# Altium PCB PCB_Down.PcbDoc (part 1 of 2)
Units mm, origin at the board's own origin, x right, y up, seen from the top; angles counter-clockwise.
Board outline 152.02 x 107.03 mm, 2 copper layers (Top Layer, Bottom Layer); 218 components, 149 nets, 1560 pads, 136 vias.
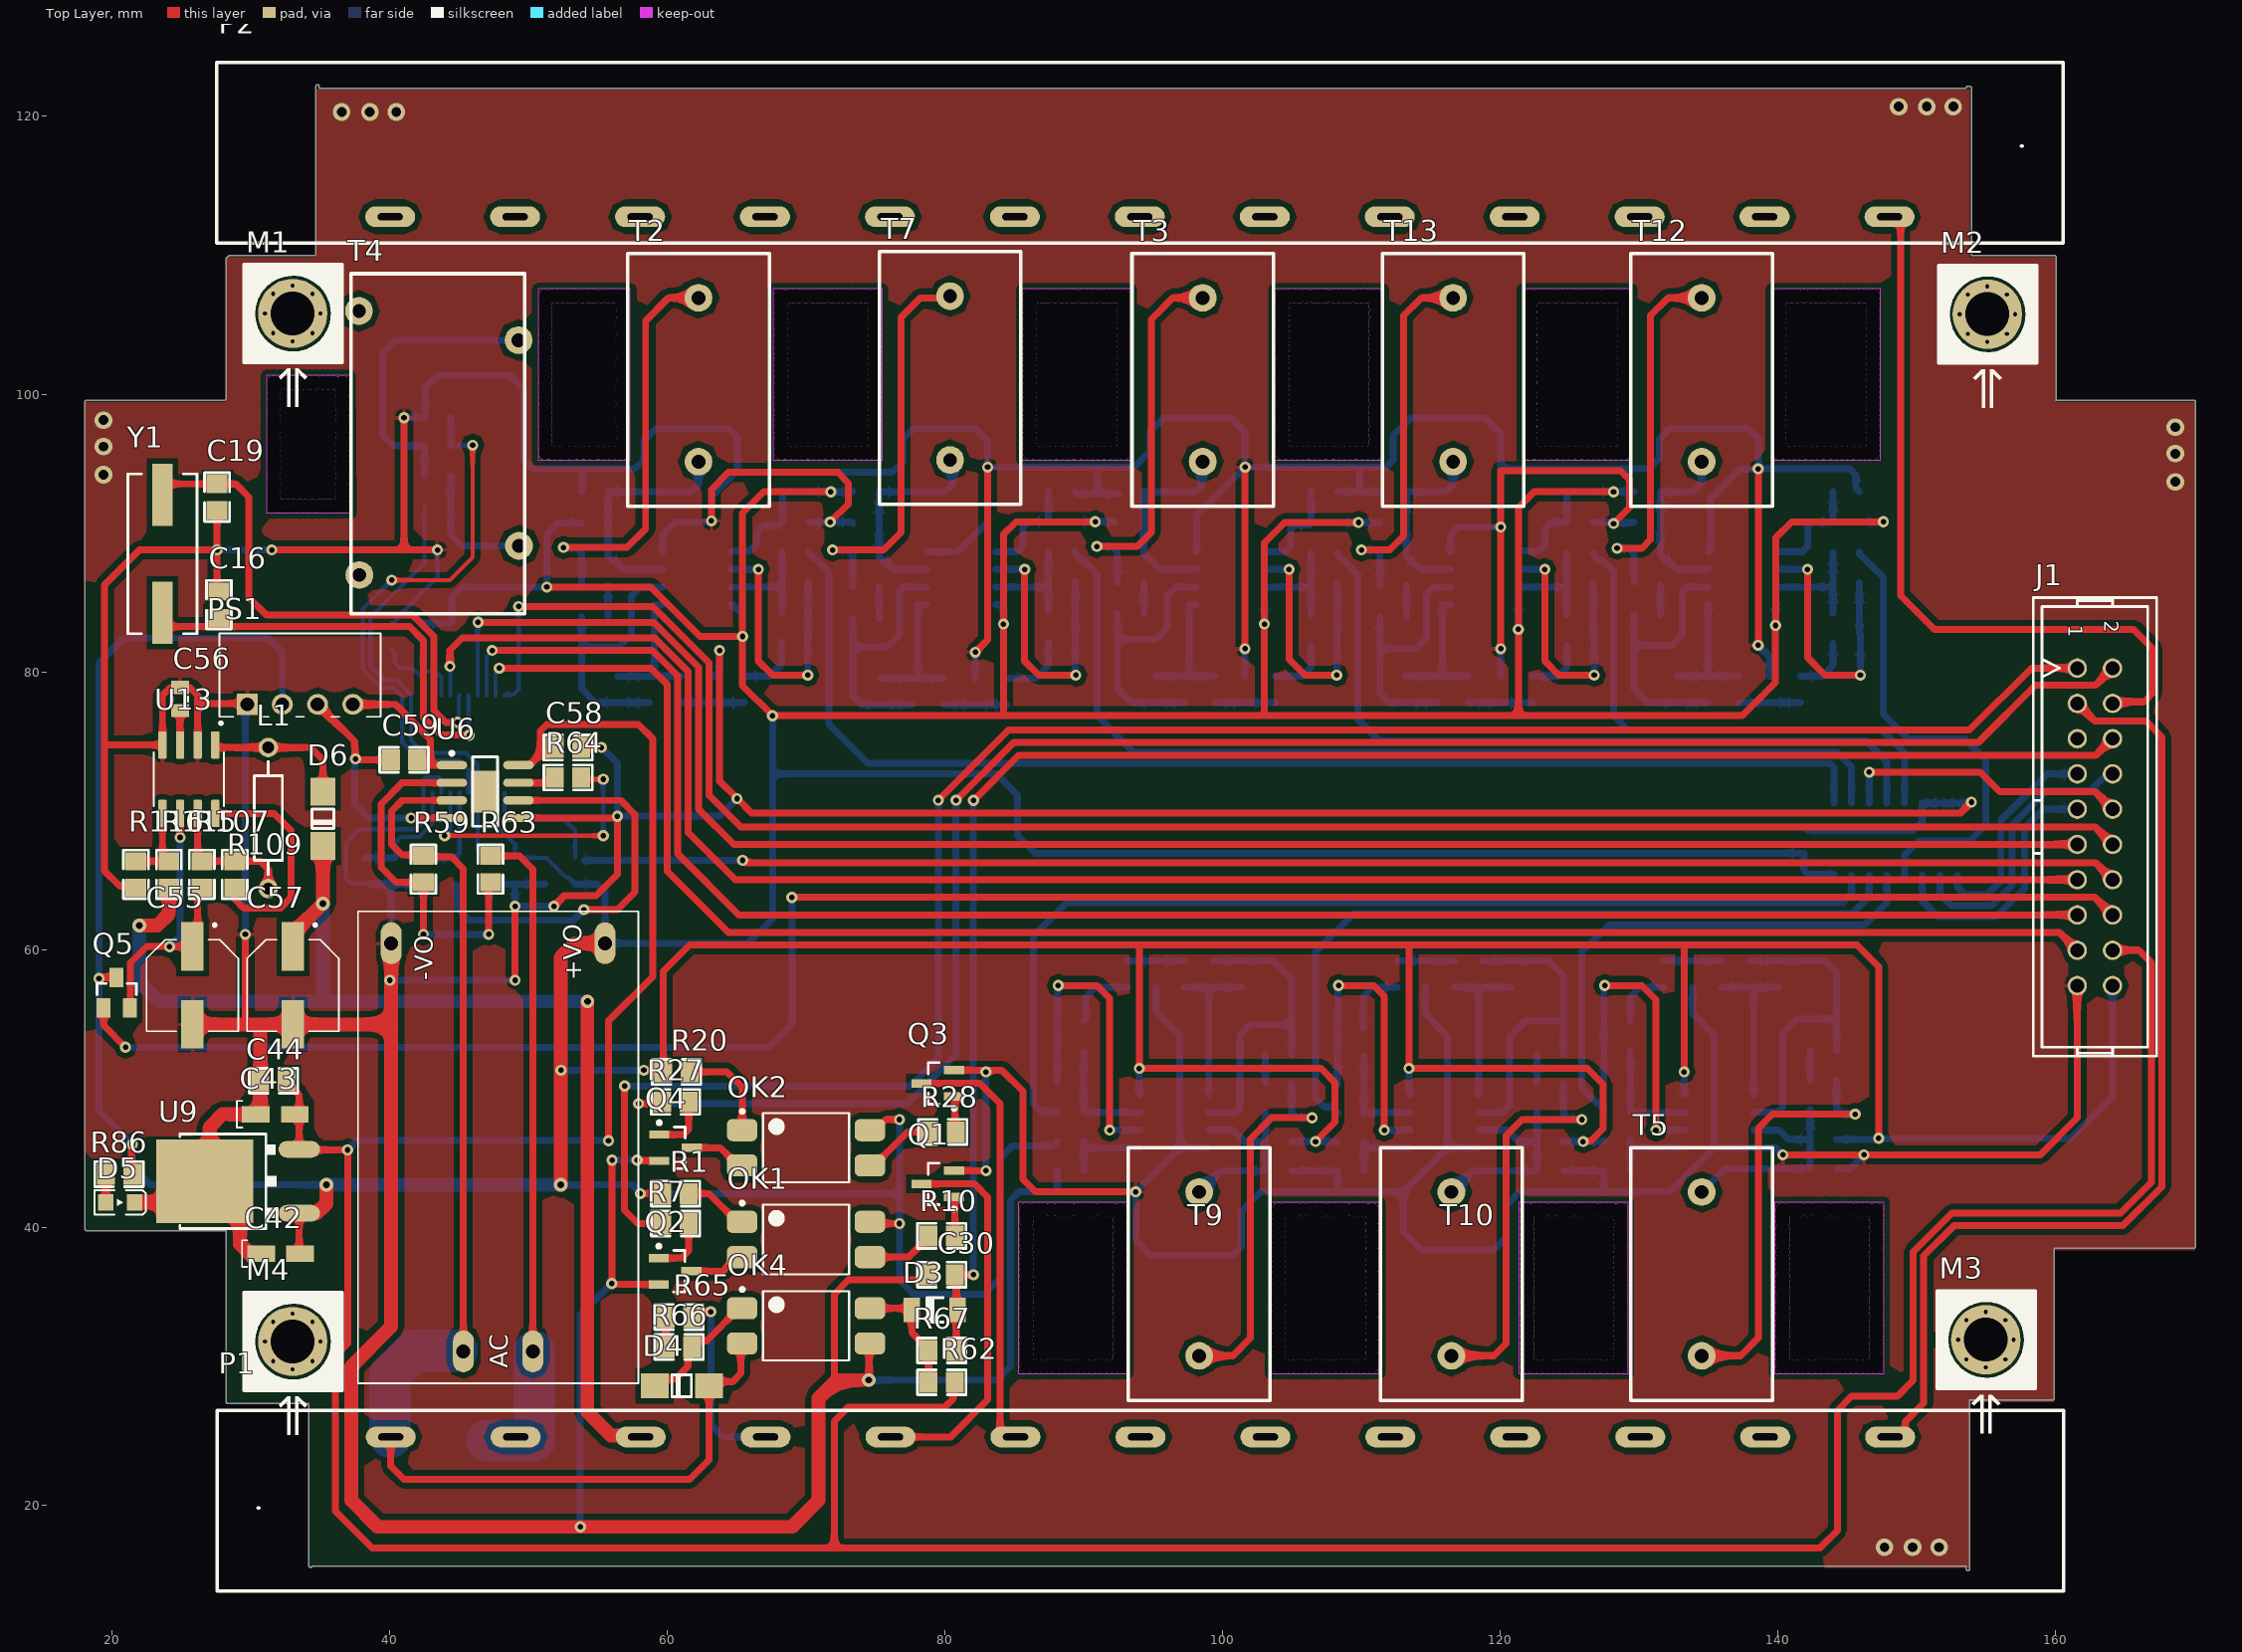
[diagram p0: Top Layer view]
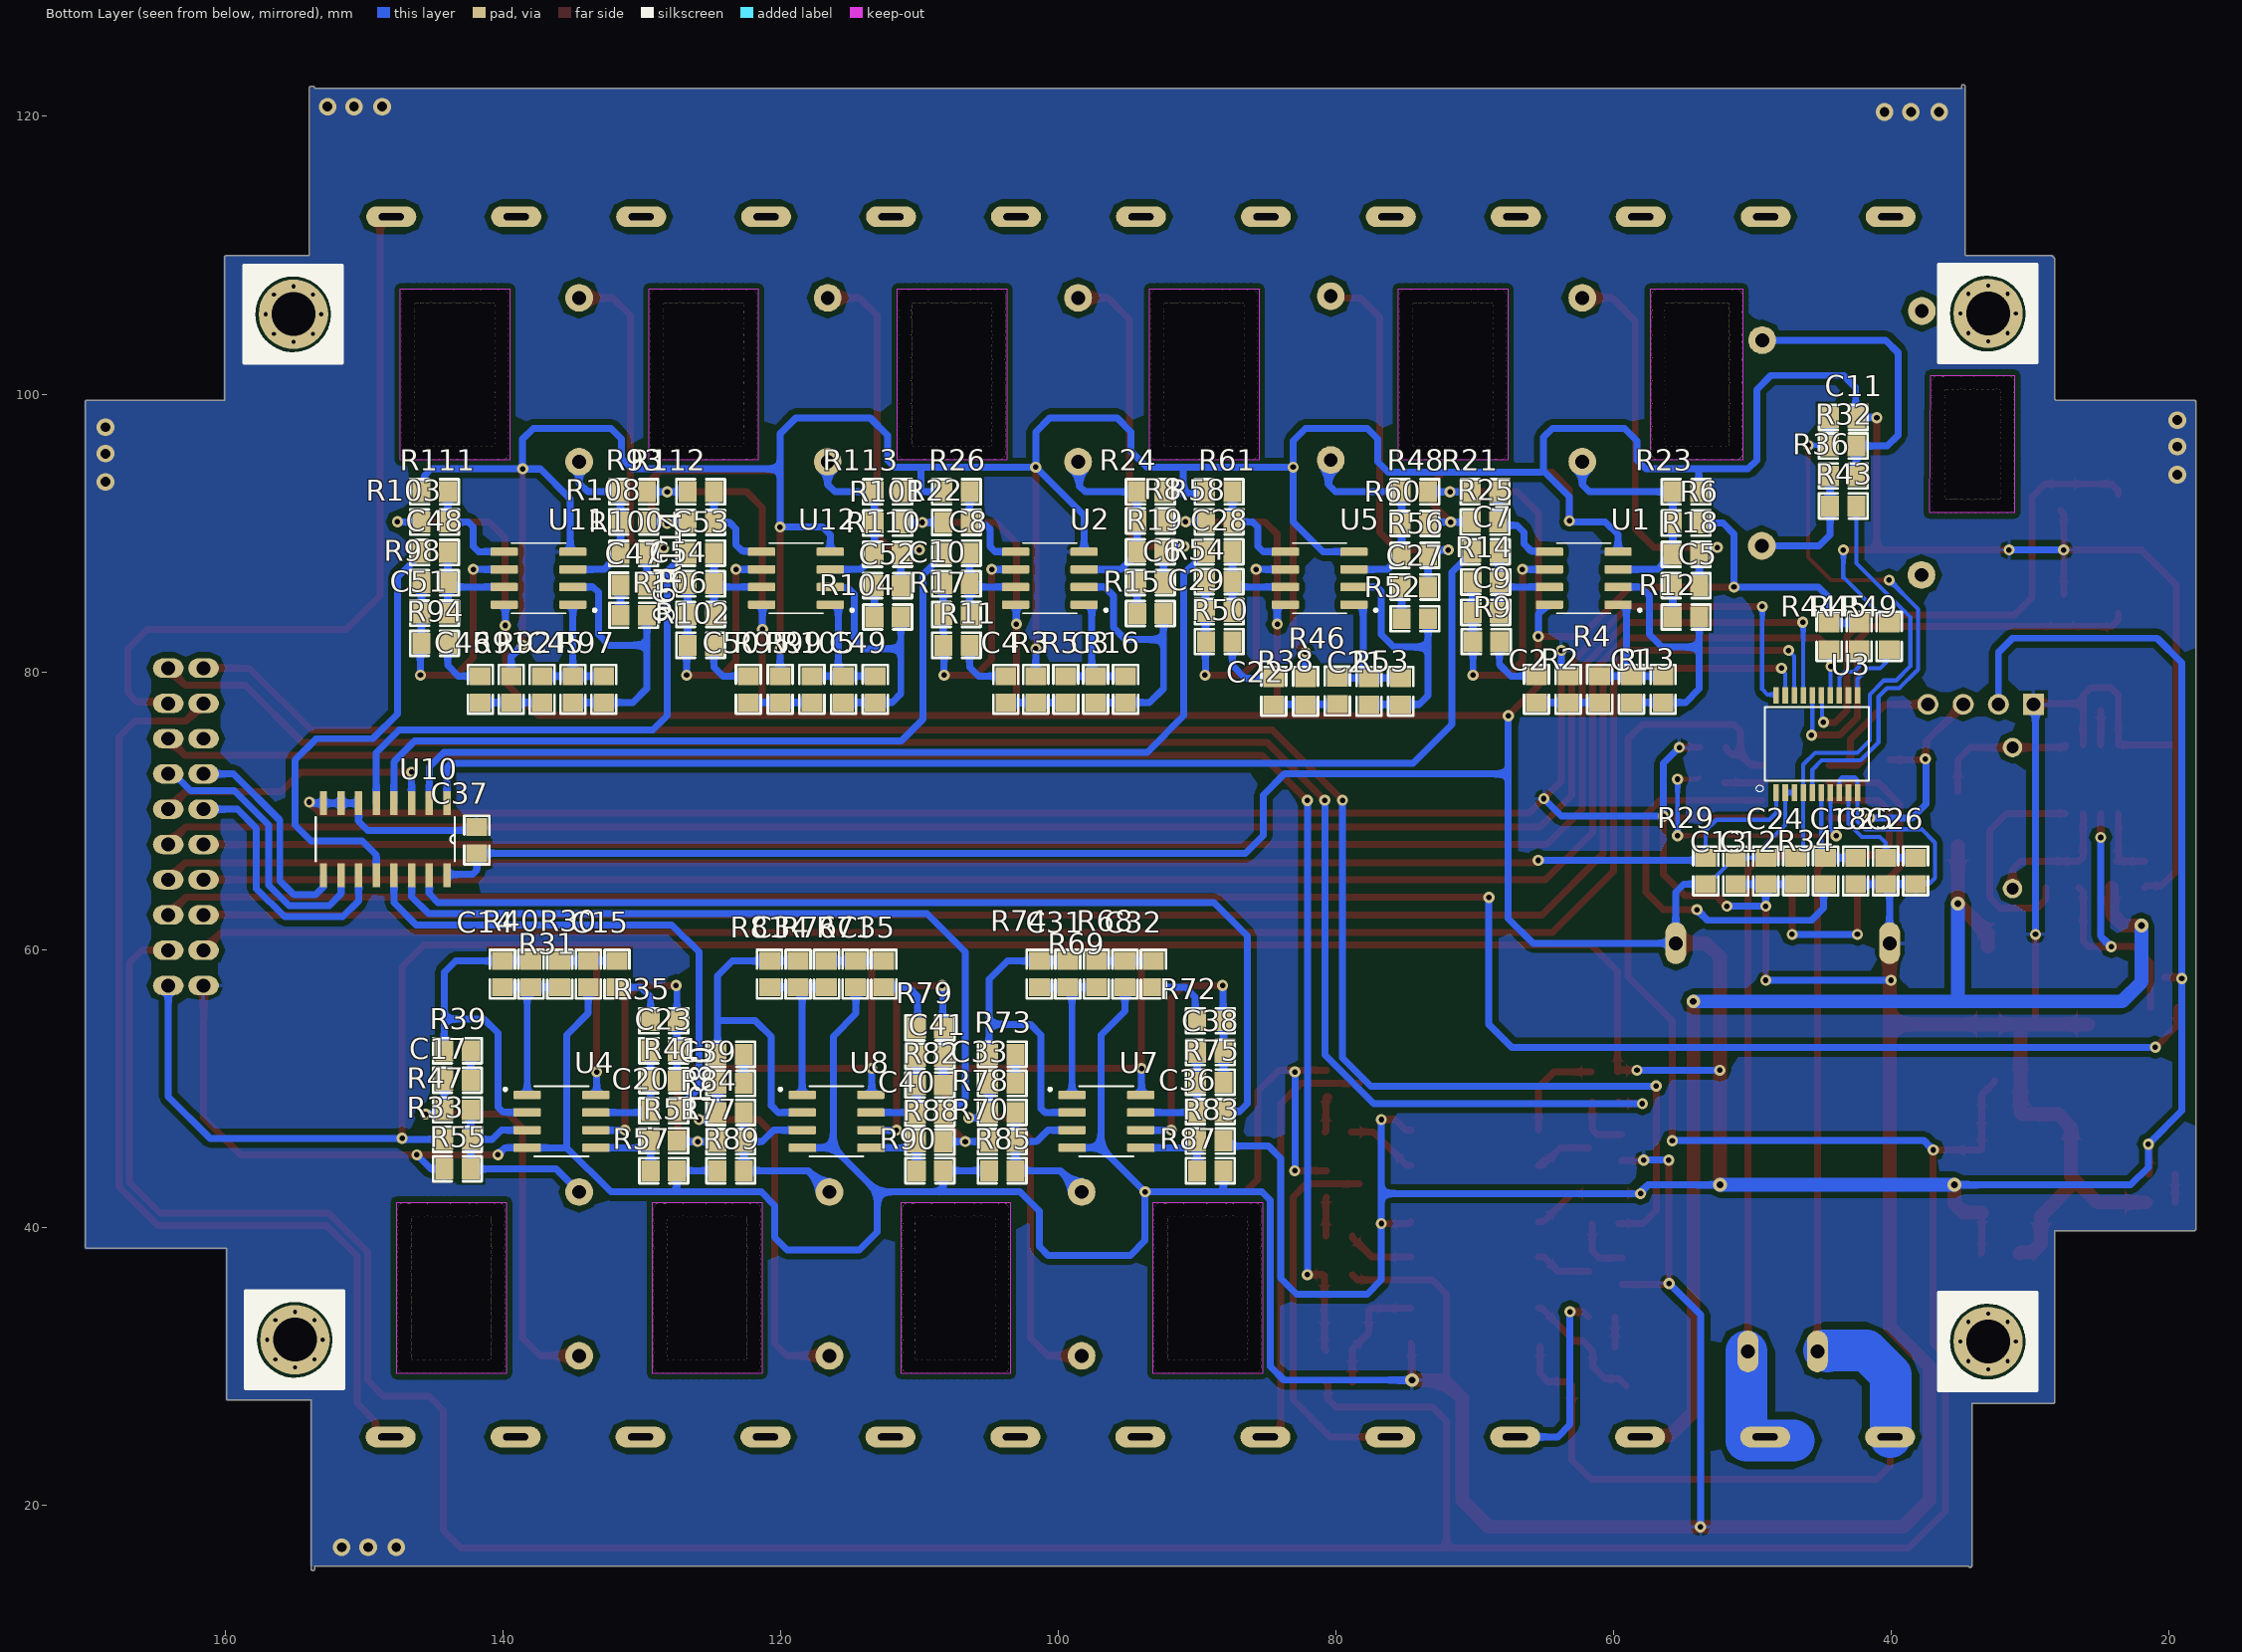
[diagram p1: Bottom Layer view, seen from below]

## Layer stack, top to bottom
Top Solder: solder mask 0.0102, Solder Resist, Dk 3.5
Top Layer: signal copper 0.0356
Dielectric 1: dielectric 0.32, FR-4, Dk 4.8
Bottom Layer: signal copper 0.0356
Bottom Solder: solder mask 0.0102, Solder Resist, Dk 3.5

## Board outline
18.161,39.751 28.194,39.751 28.194,27.432 ccw(c28.321,27.432) 28.321,27.305 34.163,27.305 34.163,15.621 ccw(c34.29,15.621) 34.412,15.585 153.543,15.585 153.543,15.391 ccw(c153.67,15.391) 153.797,15.391 153.797,27.559 159.766,27.559 ccw(c159.766,27.686) 159.893,27.686 159.893,38.481 169.926,38.481 ccw(c169.926,38.608) 170.053,38.608 170.053,99.441 ccw(c169.926,99.441) 169.926,99.568 160.02,99.568 160.02,109.855 ccw(c159.893,109.855) 159.893,109.982 153.924,109.982 153.924,122.047 ccw(c153.797,122.047) 153.797,122.174 153.67,122.174 ccw(c153.67,122.047) 153.544,122.03 34.925,122.03 34.925,122.164 ccw(c34.798,122.164) 34.671,122.164 34.671,110.057 34.596,109.982 28.47,109.982 ccw(c28.47,109.855) 28.379,109.945 28.38,109.945 28.231,109.796 28.231,109.797 ccw(c28.321,109.706) 28.194,109.706 28.194,99.643 28.119,99.568 18.31,99.568 ccw(c18.31,99.441) 18.235,99.544 ccw(c18.161,99.441) 18.034,99.441 18.034,39.878 ccw(c18.161,39.878)
cut-out: 93.139,41.782 85.265,41.782 85.265,29.463 93.139,29.463
cut-out: 111.3,41.782 103.426,41.782 103.426,29.463 111.3,29.463
cut-out: 129.207,41.782 121.333,41.782 121.333,29.463 129.207,29.463
cut-out: 147.622,41.782 139.748,41.782 139.748,29.463 147.622,29.463
cut-out: 37.132,101.345 31.115,101.345 31.115,91.44 37.211,91.44
cut-out: 57.325,107.568 50.673,107.568 50.673,95.249 57.325,95.249
cut-out: 75.486,107.568 67.612,107.568 67.612,95.249 75.486,95.249
cut-out: 93.393,107.568 85.519,107.568 85.519,95.249 93.393,95.249
cut-out: 111.554,107.568 103.68,107.568 103.68,95.249 111.554,95.249
cut-out: 129.461,107.568 121.587,107.568 121.587,95.249 129.461,95.249
cut-out: 147.368,107.568 139.494,107.568 139.494,95.249 147.368,95.249

## Design rules (kind name [scope] priority, off if disabled: settings)
Clearance [All] p1: gap=0.254 ignorepadtopadclearanceinfootprint=FALSE except(0: Arc-Hole Track-Hole SMDPad-Hole THPad-Hole Via-Hole Fill-Hole Poly-Hole Region-Hole Text-Hole; 0.4: Arc-Fill Arc-Poly Arc-Region Track-Fill Track-Poly Track-Region SMDPad-Fill SMDPad-Poly SMDPad-Region THPad-Fill THPad-Poly THPad-Region Via-Fill Via-Poly Via-Region Fill-Fill Fill-Poly Fill-Region Poly-Poly Poly-Region Region-Region)
PolygonConnect [All] p1: connectstyle=Relief reliefconductorwidth=0.254 reliefentries=4 polygonreliefangle="90 Angle" airgapwidth=0.254
RoutingVias [All] p1: holewidth=0.4 width=0.8 viastyle="Through Hole" minholewidth=0.4 minwidth=0.8 maxholewidth=0.4 maxwidth=0.8
SolderMaskExpansion [All] p1: expansion=0.102 istentingtop=FALSE
Width [All] p1: maxlimit=3 minlimit=0.3 preferedwidth=0.5 minimp=50.000000 maximp=50.000000 favimp=50.000000
30 further rules are at their usual default settings.

## Components (designator, comment, footprint, x,y, rotation, side; value= is the part's Value field where it differs from the comment)
C1 "0nF" 0805 58.692,78.74 r270 bottom value=100nF
C2 "0nF" 0805 65.532,78.74 r270 bottom value=100nF
C3 "0nF" 0805 97.282,78.74 r270 bottom value=100nF
C4 "0nF" 0805 103.759,78.74 r270 bottom value=100nF
C5 "0nF" 0805 54.762,86.201 r180 bottom value=100nF
C6 "0nF" 0805 93.346,86.423 r180 bottom value=100nF
C7 "0nF" 0805 69.215,88.646 r180 bottom value=100nF
C8 "0nF" 0805 107.315,88.544 r180 bottom value=100nF
C9 "0nF" 0805 69.191,84.277 r0 bottom value=100nF
C10 "0nF" 0805 107.315,86.335 r0 bottom value=100nF
C11 "33nF" 0805 43.433,98.323 r180 bottom
C12 "10uF" 0805 49.022,65.659 r270 bottom
C13 "100nF" 0805 51.181,65.659 r270 bottom
C14 "0nF" 0805 140.017,58.227 r90 bottom value=100nF
C15 "0nF" 0805 131.762,58.227 r90 bottom value=100nF
C16 "22pF" 0805 27.686,84.836 r90 top
C17 "0nF" 0805 143.256,50.578 r0 bottom value=100nF
C18 "33nF" 0805 42.545,65.659 r90 bottom
C19 "22pF" 0805 27.559,92.583 r270 top
C20 "0nF" 0805 128.396,48.387 r0 bottom value=100nF
C21 "0nF" 0805 77.597,78.592 r270 bottom value=100nF
C22 "0nF" 0805 84.455,78.592 r270 bottom value=100nF
C23 "0nF" 0805 128.396,52.705 r180 bottom value=100nF
C24 "33nF" 0805 46.863,65.659 r90 bottom
C25 "100nF" 0805 40.386,65.659 r90 bottom
C26 "10uF" 0805 38.227,65.659 r90 bottom
C27 "0nF" 0805 74.294,86.106 r180 bottom value=100nF
C28 "0nF" 0805 88.391,88.646 r180 bottom value=100nF
C29 "0nF" 0805 88.391,84.328 r0 bottom value=100nF
C30 "100nF" 0805 79.756,36.576 r0 top
C31 "0nF" 0805 99.289,58.227 r90 bottom value=100nF
C32 "0nF" 0805 93.116,58.227 r90 bottom value=100nF
C33 "0nF" 0805 104.012,50.355 r0 bottom value=100nF
C34 "0nF" 0805 118.72,58.227 r90 bottom value=100nF
C35 "0nF" 0805 112.547,58.227 r90 bottom value=100nF
C36 "0nF" 0805 89.028,48.323 r0 bottom value=100nF
C37 "100nF" 0805 141.859,67.879 r90 bottom
C38 "0nF" 0805 89.028,52.578 r180 bottom value=100nF
C39 "0nF" 0805 123.571,50.355 r0 bottom value=100nF
C40 "0nF" 0805 109.219,48.184 r0 bottom value=100nF
C41 "0nF" 0805 109.219,52.299 r180 bottom value=100nF
C42 "10uF" "Cap1206_(3216X18L)Size A" 30.734,38.1 r0 top
C43 "10uF" "Cap1206_(3216X18L)Size A" 30.353,48.133 r0 top
C44 "100nF" 0805 31.623,50.546 r180 top
C45 "0nF" 0805 134.938,78.74 r270 bottom value=100nF
C46 "0nF" 0805 141.605,78.74 r270 bottom value=100nF
C47 "0nF" 0805 130.556,86.233 r180 bottom value=100nF
C48 "0nF" 0805 144.907,88.595 r180 bottom value=100nF
C49 "0nF" 0805 113.157,78.74 r270 bottom value=100nF
C50 "0nF" 0805 122.301,78.74 r270 bottom value=100nF
C51 "0nF" 0805 144.907,84.226 r0 bottom value=100nF
C52 "0nF" 0805 112.268,86.201 r180 bottom value=100nF
C53 "0nF" 0805 125.73,88.544 r180 bottom value=100nF
C54 "0nF" 0805 125.73,86.335 r0 bottom value=100nF
C55 "Cap2" "cap 100uF" 22.452,61.303 r270 top value=100uF
C56 "Cap" CAP805 24.892,78.866 r270 top value=1.5nF
C57 "Cap2" "cap 100uF" 29.691,61.303 r270 top value=100uF
C58 "100nF" 0805 52.832,74.549 r180 top
C59 "100nF" 0805 41.021,73.66 r0 top
D3 "4148" "Diode 1n4148 SMD" 80.899,34.036 r180 top
D4 "Diode 1N4007" "Diode 1N4007 SMD" 62.992,28.575 r180 top
D5 "LED SMD PACKAGE" LED_SMD_0805 20.574,41.783 r180 top
D6 "SS34" "Diode 1N4007 SMD" 35.179,71.374 r270 top
J1 "IDC_2X10" IDC_2X10 162.814,68.834 r270 top
L1 "Inductor" AXIAL-0.4 31.242,69.469 r90 top value=180uH
M1 "Screw" "Board Screw" 33.003,105.808 r0 top
M2 "Screw" "Board Screw" 155.067,105.759 r0 top
M3 "Screw" "Board Screw" 154.957,31.894 r0 top
M4 "Screw" "Board Screw" 33.003,31.767 r0 top
OK1 "PC817" "SMT Gullwing Lead-Form" 69.977,39.116 r0 top
OK2 "PC817" "SMT Gullwing Lead-Form" 69.977,45.72 r0 top
OK4 "PC817" "SMT Gullwing Lead-Form" 69.977,32.893 r0 top
P1 "Header 13" "terminal 13p" 171.565,29.892 r180 top locked
P2 "Header 13" "terminal 13p" 16.522,107.776 r0 top locked
PS1 "B0505S-1WR2" CONV_B0505S-1WR2 33.528,79.756 r0 top
Q1 "C945" SOT23_BEC_M 79.47,43.114 r180 top
Q2 "C945" SOT23_BEC_M 60.547,36.83 r0 top
Q3 "C945" SOT23_BEC_M 79.47,50.353 r180 top
Q4 "C945" SOT23_BEC_M 60.579,45.72 r0 top
Q5 "AO3401A" AO3401A 20.32,56.896 r0 top
R1 "Res1" 0805 60.579,42.418 r0 top value=1K
R2 "?K" 0805 63.252,78.74 r270 bottom
R3 "?K" 0805 101.6,78.74 r270 bottom
R4 "?K" 0805 60.972,78.74 r90 bottom
R5 "?K" 0805 99.441,78.74 r90 bottom
R6 "1K" 0805 54.762,90.71 r180 bottom
R7 "Res1" 0805 60.579,40.259 r180 top value=1K
R8 "1K" 0805 93.346,90.868 r180 bottom
R9 "10K" 0805 69.154,82.169 r180 bottom
R10 "Res1" 0805 79.756,39.37 r180 top value=1K
R11 "10K" 0805 107.315,81.915 r180 bottom
R12 "1K" 0805 54.762,83.947 r0 bottom
R13 "100K" 0805 56.412,78.74 r270 bottom
R14 "100K" 0805 69.191,86.462 r0 bottom
R15 "1K" 0805 93.346,84.201 r0 bottom
R16 "100K" 0805 95.123,78.74 r270 bottom
R17 "100K" 0805 107.315,84.125 r0 bottom
R18 "100R" 0805 54.762,88.456 r180 bottom
R19 "100R" 0805 93.346,88.646 r180 bottom
R20 "Res1" 0805 60.645,51.181 r0 top value=1K
R21 "10K" 0805 69.238,92.964 r0 bottom
R22 "10K" 0805 107.315,90.754 r0 bottom
R23 "1K" 0805 54.762,92.964 r0 bottom
R24 "1K" 0805 93.346,92.964 r0 bottom
R25 "10K" 0805 69.239,90.78 r180 bottom
R26 "10K" 0805 107.315,92.964 r180 bottom
R27 "Res1" 0805 60.579,49.022 r180 top value=1K
R28 "Res1" 0805 79.822,46.863 r180 top value=1K
R29 "1K" 0805 53.34,65.659 r90 bottom
R30 "?K" 0805 133.826,58.227 r90 bottom
R31 "?K" 0805 135.89,58.227 r270 bottom
R32 "1K" 0805 43.433,96.266 r180 bottom
R33 "1K" 0805 143.256,46.323 r0 bottom
R34 "1K" 0805 44.704,65.659 r270 bottom
R35 "10K" 0805 128.396,54.864 r0 bottom
R36 "26" 0805 43.433,94.107 r0 bottom
R38 "?K" 0805 82.169,78.592 r270 bottom
R39 "1K" 0805 143.256,52.705 r180 bottom
R40 "100K" 0805 137.954,58.227 r90 bottom
R41 "100K" 0805 128.396,50.546 r180 bottom
R43 "1K" 0805 43.433,91.948 r180 bottom
R44 "1K" 0805 44.45,82.55 r270 bottom
R45 "1K" 0805 42.291,82.55 r270 bottom
R46 "?K" 0805 79.883,78.613 r90 bottom
R47 "100R" 0805 143.256,48.45 r0 bottom
R48 "1K" 0805 74.294,92.964 r180 bottom
R49 "1K" 0805 40.132,82.55 r270 bottom
R50 "10K" 0805 88.391,82.169 r180 bottom
R51 "10K" 0805 128.396,46.228 r180 bottom
R52 "1K" 0805 74.294,83.82 r0 bottom
R53 "100K" 0805 75.311,78.592 r270 bottom
R54 "100K" 0805 88.391,86.487 r0 bottom
R55 "1K" 0805 143.256,44.196 r180 bottom
R56 "100R" 0805 74.294,88.392 r180 bottom
R57 "10K" 0805 128.396,44.069 r0 bottom
R58 "10K" 0805 88.391,90.805 r0 bottom
R59 "1K" 0805 42.418,65.786 r90 top
R60 "1K" 0805 74.294,90.678 r0 bottom
R61 "10K" 0805 88.391,92.964 r180 bottom
R62 "Resistor" 0805 79.75,28.829 r0 top value=1M
R63 "1K" 0805 47.244,65.786 r270 top
R64 "5K6" 0805 52.832,72.39 r180 top
R65 "Resistor" 0805 60.833,33.528 r0 top value=100k
R66 "Resistor" 0805 60.833,31.369 r180 top value=100k
R67 "Resistor" 0805 79.751,31.115 r180 top value=1M
R68 "?K" 0805 95.174,58.227 r90 bottom
R69 "?K" 0805 97.231,58.227 r270 bottom
R70 "1K" 0805 104.012,46.164 r0 bottom
R71 "?K" 0805 114.605,58.227 r90 bottom
R72 "10K" 0805 89.028,54.864 r0 bottom
R73 "1K" 0805 104.012,52.451 r180 bottom
R74 "100K" 0805 101.346,58.227 r90 bottom
R75 "100K" 0805 89.028,50.451 r180 bottom
R76 "?K" 0805 116.662,58.227 r270 bottom
R77 "1K" 0805 123.571,46.164 r0 bottom
R78 "100R" 0805 104.012,48.26 r0 bottom
R79 "10K" 0805 109.219,54.356 r0 bottom
R80 "1K" 0805 123.571,52.451 r180 bottom
R81 "100K" 0805 120.777,58.227 r90 bottom
R82 "100K" 0805 109.219,50.241 r180 bottom
R83 "10K" 0805 89.028,46.196 r180 bottom
R84 "100R" 0805 123.571,48.26 r0 bottom
R85 "1K" 0805 104.012,44.069 r180 bottom
R86 "1K" 0805 20.495,43.815 r180 top
R87 "10K" 0805 89.028,44.069 r0 bottom
R88 "10K" 0805 109.219,46.126 r180 bottom
R89 "1K" 0805 123.571,44.069 r180 bottom
R90 "10K" 0805 109.219,44.069 r0 bottom
R91 "?K" 0805 139.382,78.74 r270 bottom
R92 "?K" 0805 137.16,78.74 r90 bottom
R93 "1K" 0805 130.556,92.964 r180 bottom
R94 "10K" 0805 144.907,82.042 r180 bottom
R95 "?K" 0805 120.015,78.74 r270 bottom
R96 "1K" 0805 130.556,84.074 r0 bottom
R97 "100K" 0805 132.715,78.74 r270 bottom
R98 "100K" 0805 144.907,86.411 r0 bottom
R99 "?K" 0805 117.729,78.74 r90 bottom
R100 "100R" 0805 130.556,88.519 r180 bottom
R101 "1K" 0805 112.268,90.71 r180 bottom
R102 "10K" 0805 125.73,81.915 r180 bottom
R103 "10K" 0805 144.907,90.78 r0 bottom
R104 "1K" 0805 112.268,83.947 r0 bottom
R105 "100K" 0805 115.443,78.74 r270 bottom
R106 "100K" 0805 125.73,84.125 r0 bottom
R107 "Res1" 0805 26.458,65.405 r90 top value=0.5R
R108 "1K" 0805 130.556,90.805 r0 bottom
R109 "Res1" 0805 28.829,65.405 r270 top value=180R
R110 "100R" 0805 112.268,88.455 r180 bottom
R111 "10K" 0805 144.907,92.964 r180 bottom
R112 "10K" 0805 125.73,92.964 r0 bottom
R113 "1K" 0805 112.268,92.964 r0 bottom
R114 "10K" 0805 125.73,90.754 r180 bottom
R115 "Res1" 0805 24.088,65.405 r90 top value=18K
R116 "Res1" 0805 21.717,65.405 r90 top value=1K
T2 "CST-1020" zmct103c 57.03,110.334 r270 top
T3 "CST-1020" zmct103c 93.352,110.334 r270 top
T4 "CST-1020" CT1005A 38.606,110.674 r270 top
T5 "CST-1020" zmct103c 139.693,27.334 r90 top
T7 "CST-1020" zmct103c 75.153,110.455 r270 top
T9 "CST-1020" zmct103c 103.498,27.334 r90 top
T10 "CST-1020" zmct103c 121.659,27.334 r90 top
T12 "CST-1020" zmct103c 129.293,110.334 r270 top
T13 "CST-1020" zmct103c 111.386,110.334 r270 top
U1 "LM358D" SOIC127P599X175-8N 62.127,86.741 r0 bottom
U2 "LM358D" SOIC127P599X175-8N 100.584,86.741 r0 bottom
U3 "ADE7753" SSOP-20 45.339,74.803 r90 bottom
U4 "LM358D" SOIC127P599X175-8N 135.763,47.625 r180 bottom
U5 "LM358D" SOIC127P599X175-8N 81.153,86.741 r0 bottom
U6 "AMC1100DWV" "SOIC 8 - THPAD" 46.863,71.374 r0 top
U7 "LM358D" SOIC127P599X175-8N 96.52,47.625 r180 bottom
U8 "LM358D" SOIC127P599X175-8N 115.951,47.625 r180 bottom
U9 "LF33" DPAK_3 33.47,43.307 r90 top
U10 "74HC4051D" SOIC127P600X175-16N 148.463,67.945 r270 bottom
U11 "LM358D" SOIC127P599X175-8N 137.414,86.741 r0 bottom
U12 "LM358D" SOIC127P599X175-8N 118.872,86.741 r0 bottom
U13 "MC34063AD" SOIC127P599X175-8N 25.527,72.263 r270 top
Y1 "16 MHz" "Crystal SMD" 23.622,88.494 r270 top
? "HLK-PM01" HLK-PM01 47.799,45.752 r90 top

## Footprints (in the part's own frame and the unit in brackets; to place one, negate y for a bottom-side part, rotate by r counter-clockwise, add the part's x,y. Pads: shape width x height; smd on the part's side, far side on the other; paste and mask are expansions set on the pad)
0805 [mm]
  rect 1.3x1.5 smd: 1(-0.95,0) 2(0.95,0)
  silkscreen extent -1.75,-0.9 1.75,0.9, body extent -1.65,-0.89 1.65,0.89, height 1
AO3401A [mm] "Mosfet"
  rect 1x1.4 smd: 1(-0.95,-1.1) 2(0.95,-1.1) 3(0,1.1)
  silkscreen extent -1.42,-0.15 1.42,0.66, body extent -1.5,-1.13 1.5,1.13, height 1.28
AXIAL-0.4 [mm] "Axial Device, Thru-Hole; 2 Leads; 0.4 in Pin Spacing"
  round 1.4 hole 0.85: 1(-5.08,0) 2(5.08,0)
  silkscreen extent -4.06,-1.02 4.06,1.02
"Board Screw" [mm]
  round 0.6 hole 0.3: S(-2,0) S(-1.414,-1.414) S(-1.414,1.414) S(0,-2) S(0,2) S(1.414,-1.414) S(1.414,1.414) S(2,0)
  round 5 hole 3.15 mask+0.1: S(0,0)
  silkscreen extent -3.49,-6.75 3.56,3.52, body extent -2.67,-2.64 2.69,2.72, height 2.34
CAP805 [mm]
  rect 0.95x1.3 smd: 1(0,0) 2(1.65,0)
  silkscreen extent 0.67,-0.55 0.97,0.55, body extent -0.19,-0.63 1.84,0.63, height 0.65
"Cap1206_(3216X18L)Size A" [mm] "Chip Capacitor, 2-Leads, Body 3.2x1.6mm, IPC High Density, chip Tantalum"
  rect 1.999x1.199 smd: 1(0,0) 2(2.8,0)
  silkscreen extent -1.38,-0.97 -0.99,0.97, body extent -0.43,-0.9 3.21,0.9, height 1.8
"cap 100uF" [mm]
  rect 3.5x1.6 smd: 1(1.093,3.329) 2(6.693,3.329)
  silkscreen extent -0.56,0.03 7.19,6.63, body extent 1.07,0.82 6.91,5.98, height 5.22
CONV_B0505S-1WR2 [mm]
  rect 1.508x1.508 hole 1: 1(-3.81,-2.1)
  round 1.508 hole 1: 2(-1.27,-2.1) 3(1.27,-2.1) 4(3.81,-2.1)
  silkscreen extent -6.84,-3 5.8,3
"Crystal SMD" [mm] "DESIGNER ABBAS BASEREH"
  rect 4.5x1.5 smd: 1(-4.25,0) 2(4.25,0)
  silkscreen extent -5.75,-2.5 5.75,2.5, body extent -6.21,-2.25 6.09,2.25, height 5.18
CT1005A [mm]
  round 2 hole 1: 1(6.788,10.67) 2(21.6,10.7) 3(23.7,-0.8) 4(4.688,-0.829)
  silkscreen extent 2,-1.4 26.5,11.1, body extent 2.4,-0.7 26.41,10.4, height 25.2
"Diode 1N4007 SMD" [mm] "DO-214AC 1N4001-4007"
  rect 2x1.8 smd: 1(0,0) 2(3.92,0)
  silkscreen extent 1.27,-0.81 2.67,0.83, body extent -0.54,-1.36 4.46,1.34, height 2.16
"Diode 1n4148 SMD" [mm] "Mini MELF SOD-80"
  rect 1.2x1.75 smd: 1(0,0) 2(3.3,0)
  silkscreen extent 1.04,-0.88 2.22,0.87, body extent -0.13,-0.75 3.37,0.75, height 1.55
DPAK_3 [mm] "D-PAK (TO-252), 3-Pads, Body 6.2x6.7mm"
  oval 1.2x3 smd: 1(-2.3,0) 3(2.3,0)
  rect 6x7 smd: 4(0,6.8)
  silkscreen extent -3.4,1.63 3.4,8.6, body extent -3.37,-0.5 3.37,9.6, height 2.37
HLK-PM01 [mm]
  oval 3.016x1.508 hole 1: P$1(-14.7,2.5) P$2(-14.7,-2.5) P$3(14.7,7.7) P$4(14.7,-7.7)
  silkscreen extent -17,-10.1 17,10.1
IDC_2X10 [mm]
  round 1.4 / inner round 1.4 / far side oval 1.4x2.2 hole 1 mask+0.1: 1(-11.43,-1.27) 2(-11.43,1.27) 3(-8.89,-1.27) 4(-8.89,1.27) 5(-6.35,-1.27) 6(-6.35,1.27) 7(-3.81,-1.27) 8(-3.81,1.27) 9(-1.27,-1.27) 10(-1.27,1.27) 11(1.27,-1.27) 12(1.27,1.27) 13(3.81,-1.27) 14(3.81,1.27) 15(6.35,-1.27) 16(6.35,1.27) 17(8.89,-1.27) 18(8.89,1.27) 19(11.43,-1.27) 20(11.43,1.27)
  silkscreen extent -16.51,-4.45 16.51,4.45, body extent -16.53,-4.42 16.53,4.75, height 9.13
LED_SMD_0805 [mm] "SMD Mono-color Chip LED, body 2.0x1.25mm"
  rect 1.1x1.2 smd: 1(-1.05,0) 2(1.05,0)
  silkscreen extent -1.85,-0.88 1.85,0.88, body extent -1,-0.62 1,0.63, height 0.7
"SMT Gullwing Lead-Form" [mm] "SOP, 4-Leads, Body 4/65x6/75mm, Pitch 2/54mm, IPC Medium Density designer:abbas basereh"
  rrect50% 2.2x1.6 smd mask+0.06: 1(-4.6,1.27) 2(-4.6,-1.27) 3(4.6,-1.27) 4(4.6,1.27)
  silkscreen extent -4.72,-2.5 3.1,2.74, body extent -5,-2.29 5,2.29, height 3.89
SOIC127P599X175-8N [mm]
  rrect25% 1.97x0.6 smd: 1(-2.47,1.905) 2(-2.47,0.635) 3(-2.47,-0.635) 4(-2.47,-1.905) 5(2.47,-1.905) 6(2.47,-0.635) 7(2.47,0.635) 8(2.47,1.905)
  silkscreen extent -4.14,-2.52 1.95,2.52
SOIC127P600X175-16N [mil]
  rect 67x21 smd: 1(-102,175) 2(-102,125) 3(-102,75) 4(-102,25) 5(-102,-25) 6(-102,-75) 7(-102,-125) 8(-102,-175) 9(102,-175) 10(102,-125) 11(102,-75) 12(102,-25) 13(102,25) 14(102,75) 15(102,125) 16(102,175)
  silkscreen extent -62,-197 62,197
"SOIC 8 - THPAD" [mm] "8-Pin Small Outline Integrated Circuit 1.27 mm Pitch, IPC Medium Density"
  oval 2.2x0.6 smd: 1(-2.4,1.905) 2(-2.4,0.635) 3(-2.4,-0.635) 4(-2.4,-1.905) 5(2.4,-1.905) 6(2.4,-0.635) 7(2.4,0.635) 8(2.4,1.905)
  rect 2x3 smd: 9(0,0)
  silkscreen extent -2.52,-2.5 0.9,2.88, body extent -1.95,-2.45 1.95,2.45, height 1.73
SOT23_BEC_M [mm] "SOT23, 3-Leads, Body 2.9x1.3mm, Pitch 0.95mm, Lead Span 2.4mm, IPC Low Density"
  rect 1.45x0.6 smd: 1(-1.175,0.95) 2(-1.175,-0.95) 3(1.175,0)
  silkscreen extent -1.3,-1.5 0.7,1.92, body extent -1.23,-1.45 1.07,1.45, height 1
SSOP-20 [mm]
  rect 1.2x0.4 smd: 1(-3.5,2.925) 2(-3.5,2.275) 3(-3.5,1.625) 4(-3.5,0.975) 5(-3.5,0.325) 6(-3.5,-0.325) 7(-3.5,-0.975) 8(-3.5,-1.625) 9(-3.5,-2.275) 10(-3.5,-2.925) 11(3.5,-2.925) 12(3.5,-2.275) 13(3.5,-1.625) 14(3.5,-0.975) 15(3.5,-0.325) 16(3.5,0.325) 17(3.5,0.975) 18(3.5,1.625) 19(3.5,2.275) 20(3.5,2.925)
  silkscreen extent -3.46,-3.75 2.65,4.36
"terminal 13p" [mm]
  rrect100% 3.6x1.5 hole 0.5 slot 1.8 at 0 deg: 1(23.5,5) 2(32.5,5) 3(41.5,5) 4(50.5,5) 5(59.5,5) 6(68.5,5) 7(77.5,5) 8(86.5,5) 9(95.5,5) 10(104.5,5) 11(113.5,5) 12(122.5,5) 13(131.5,5)
  silkscreen extent 11,3.1 144,16.1, body extent 17.7,1.2 137.48,17.44, height 20.54
zmct103c [mm]
  round 2 hole 1: 1(3.4,5.2) 2(15.2,5.2)
  silkscreen extent 0.2,0.1 18.4,10.3

## Part data
C1 C2 C3 C4 C5 C6 C7 C8 C9 C10 C14 C15 C17 C20 C21 C22 C23 C27 C28 C29 C30 C31 C32 C33 C34 C35 C36 C37 C38 C39 C40 C41 C44 C45 C46 C47 C48 C49 C50 C51 C52 C53 C54: library part "CAP SMD PACKAGE", "TOTAL CAPACITOR SMD PACK", Data=2017-3-10, Desc.="CAP SMD TOTAL PACKAGES", Designer="Abbas Basereh"
C11 C12 C13 C16 C18 C19 C24 C25 C26 C58 C59: library part Cap-Bipolar, "Bipolar Capacitor", Voltage=100V, Adding Date=1387/12/20, Designer="Saeid Jorablo", Organazation=ControTec
C42 C43: library part Cap_10uF_POL_10%_TANA, "Polarized Capacitor,10uF,10V,10%,typeA,VISHAY", Manuf_1=VISHAY, Manuf_Part_1=293D106X9010A2TE3, ECCN_US/EU=n/a, Revision="July-2002: Re-released for DXP Platform."
C55 C56 C57: "Capacitor", Publisher="Altium Limited"
  C55 C57: PackageDescription="Capacitor; 2 Leads", PackageReference=CAPR5-4X5, Published=23-Sep-2002
  C56: LatestRevisionDate=17-Jul-2002, LatestRevisionNote="Re-released for DXP Platform.", PackageDescription="Radial Cap, Thru-Hole; 2 Leads; 0.3 in Pin Spacing", PackageReference=RAD-0.3, Published=8-Jun-2000
D3: library part Diode, "Default Diode", Code_JEDEC=DO-214-AB, LatestRevisionDate=17-Jul-2002, LatestRevisionNote="Re-released for DXP Platform.", PackageDescription="DO-214-AB/SMC; 2 C-Bend Leads; Body 7.9 x 5.9 mm, inc. leads (LxW)", PackageReference=SMC, PackageVersion=Sep-1996, Published=8-Jun-2000, Publisher="Altium Limited"
D4: "1 Amp General Purpose Rectifier", Code_JEDEC=DO-204-AL, ComponentLink1Description="Manufacturer Link", ComponentLink1URL=http://www.fairchildsemi.com/, ComponentLink2Description=Datasheet, ComponentLink2URL=http://www.fairchildsemi.com/ds/1N%2F1N4001.pdf, DatasheetVersion=1998, LatestRevisionDate=17-Jul-2002, LatestRevisionNote="Re-released for DXP Platform.", PackageReference=DO-41, PackageVersion=Aug-1999, Published=8-Jun-2000, Publisher="Altium Limited"
D5: "SMD Mono-color Chip LED Waterclear", Forward Voltage="3.2 V", Part Number=150080BS75000, Peak Wavelength="465 nm", Published Date="Jan 2017", Publisher="Ali Hafizi"
D6: library part "Diode 1N4007", "1 Amp General Purpose Rectifier", Code_JEDEC=DO-204-AL, ComponentLink1Description="Manufacturer Link", ComponentLink1URL=http://www.fairchildsemi.com/, ComponentLink2Description=Datasheet, ComponentLink2URL=http://www.fairchildsemi.com/ds/1N%2F1N4001.pdf, DatasheetVersion=1998, LatestRevisionDate=17-Jul-2002, LatestRevisionNote="Re-released for DXP Platform.", PackageReference=DO-41, PackageVersion=Aug-1999, Published=8-Jun-2000, Publisher="Altium Limited"
J1: "CONN, IDC, Male, pitch: 2.54mm, 20POS"
M1 M2 M3 M4: library part "Board Screw 3MM", "Board Screw With Spacer"
OK1 OK2 OK4: "Optoisolator 5kv Trans 4smd", Package="SMD-4 Sharp Microelectronics", Availability=Unavailable, MF="Sharp Microelectronics", MP=PC817XI, Price=None
P1 P2: "Header, 13-Pin", LatestRevisionDate=17-Jul-2002, LatestRevisionNote="Re-released for DXP Platform.", Publisher="Altium Limited"
PS1: "1W isolated DC-DC with Fixed Input Voltage;unregulated Single Output", Package=None, Availability=Unavailable, MF=MORNSUN, MP=B0505S-1WR2, Price=None, SnapEDA_Link=https://www.snapeda.com/parts/B0505S-1WR2/MORNSUN/view-part/586695/?ref=snap
Q1 Q2 Q3 Q4: "NPN Silicon Epitaxial Planar Transistor", ComponentLink1Description="Manufacturer Link", ComponentLink1URL=http://www.taitroncomponents.com/, ComponentLink2Description=Datasheet, ComponentLink2URL=http://www.taitroncomponents.com/, DatasheetVersion=2017, LatestRevisionDate=2017, LatestRevisionNote="IPC-7351 Footprint Added.", PackageDescription="3-Pin SOT-23 Package 0.95 mm Pitch, 2.3 mm Lead Span", PackageReference=SOT23, PackageVersion=2017-2-8, Published=2017-2-8, Publisher="Abbas Basereh"
Q5: "Trans MOSFET P-CH 30V 4A 3-Pin SOT-23", Package="SOT-23 Alpha &amp; Omega Semiconductor", Digi-Key_Part_Number=785-1001-1-ND, Digi-Key_Purchase_URL=https://www.digikey.com/product-detail/en/alpha-omega-semiconductor-inc/AO3401A/785-1001-1-ND/1855943?utm_source=snapeda&utm_medium=aggregator&utm_campaign=symbol, MF="Alpha &", MP=AO3401A, SnapEDA_Link=https://www.snapeda.com/parts/AO3401A/Alpha%20%26%20Omega%20Semiconductor%20Inc./view-part/227978/?ref=snap
R1 R7 R10 R20 R27 R28 R107 R109 R115 R116: "Resistor", LatestRevisionDate=17-Jul-2002, LatestRevisionNote="Re-released for DXP Platform.", PackageReference=AXIAL-0.3, Published=8-Jun-2000, Publisher="Altium Limited"
  R107 R109 R115 R116: PackageDescription="Axial Device, Thru-Hole; 2 Leads; 0.3 in Pin Spacing"
R2 R3 R4 R5 R6 R8 R9 R11 R12 R13 R14 R15 R16 R17 R18 R19 R21 R22 R23 R24 R25 R26 R29 R30 R31 R32 R33 R34 R35 R36 R38 R39 R40 R41 R43 R44 R45 R46 R47 R48 R49 R50 R51 R52 R53 R54 R55 R56 R57 R58 R59 R60 R61 R63 R64 R68 R69 R70 R71 R72 R73 R74 R75 R76 R77 R78 R79 R80 R81 R82 R83 R84 R85 R86 R87 R88 R89 R90 R91 R92 R93 R94 R95 R96 R97 R98 R99 R100 R101 R102 R103 R104 R105 R106 R108 R110 R111 R112 R113 R114: library part "RES SMD PACKAGE", "TOTAL SMD RESISTOR PACK", Data=2017-3-10, Desc.="RES SMD PAKAGES", Designer="Abbas Basereh"
R62 R65 R66 R67: library part Res1, LatestRevisionDate=17-Jul-2002, LatestRevisionNote="Re-released for DXP Platform.", PackageReference=AXIAL-0.3, Published=8-Jun-2000, Publisher="Altium Limited"
T2 T3 T4 T5 T7 T9 T10 T12 T13: "20A Current Sense Transformer 50/60Hz 40Ohm Through Hole", Package="Triad Magnetics", Availability=Unavailable, MF="Triad Magnetics", MP=CST-1020, NOTE_1="User to provide the resistor", NOTE_2="User to provide primary", Price=None, SnapEDA_Link=https://www.snapeda.com/parts/CST-1020/Triad%20Magnetics/view-part/49859/?ref=snap
U1 U2 U4 U5 U7 U8 U11 U12: "Dual standard operational amplifier 8-SOIC 0 to 70", Package="SOIC-8 Texas Instruments", Arrow_Asia-Purchase-URL=https://snapeda.com/shop?store=Arrow+Asia&id=4793021, Arrow_Electronics-Purchase-URL=https://snapeda.com/shop?store=Arrow+Electronics&id=4793021, Digi-Key_Part_Number=296-1014-2-ND, DigiKey-Purchase-URL=https://snapeda.com/shop?store=DigiKey&id=4793021, MF="Texas Instruments", Mouser-Purchase-URL=https://snapeda.com/shop?store=Mouser&id=4793021, MP=LM358D, SnapEDA_Link=https://www.snapeda.com/parts/LM358D/Texas%20Instruments/view-part/4793021/?ref=snap, Texas_Instruments-Purchase-URL=https://snapeda.com/shop?store=Texas+Instruments&id=4793021
U3: "IC ENERGY METERING 1PHASE 20SSOP", Package="SSOP-20 Analog Devices", Digi-Key_Part_Number=ADE7753ARSZRLCT-ND, MF="Analog Devices", MP=ADE7753, SnapEDA_Link=https://www.snapeda.com/parts/ADE7753/Analog%20Devices%20Inc./view-part/3209960/?ref=snap
U6: "Fully-Differential Isolation Amplifier, Low-Side Operation 3.3 v, Input Bandwidth 60 Khz Min", Package=None, Availability=Unavailable, MP=AMC1100DWV, Price=None
U9: library part VREG_LFXX_TO252, "REG, Linear, LDO0.45V, 0.5A, TO-252", =http://www.chila.ir, MANF=ST, MANF_P#=LF33, PARAM="LDO0.45V, 0.5A", PARAM2=1.5/1.8/2.5/3.3/5V, Price=1500t
U10: "Single 8-Channel Analog Multiplexer/Demultiplexer, VCC=2 to 6V, PD=500mW, tpd/tpz=15ns_typ._", Package="SOIC-16 Toshiba", Availability=Unavailable, MF="Toshiba Semiconductor", MP=74HC4051D, Price=None, SnapEDA_Link=https://www.snapeda.com/parts/74HC4051D/Toshiba%20Semiconductor%20and%20Storage/view-part/?ref=snap
U13: "DC-to-DC Converter Control Circuit", Code_IPC=SOIC127P600-8, Code_JEDEC=MS-012-AA, ComponentLink1Description="Manufacturer Link", ComponentLink1URL=http://www.onsemi.com/site/products/taxonomy/0,4438,503,00.html, ComponentLink2Description=Datasheet, ComponentLink2URL=http://www.onsemi.com/pub/Collateral/MC34063A-D.PDF, DatasheetVersion=1988, LatestRevisionDate=13-Apr-2006, LatestRevisionNote="IPC-7351 Footprint Added.", PackageDescription="8-Pin Small Outline Integrated Circuit 1.27 mm Pitch", PackageReference=751-02, Published=17-Jul-2002, Publisher="Altium Limited"
Y1: library part XTAL, "XTAL Crystal", Company=E.P.I.L, Design Date=11/04/2011
?: "HI-LINK Ultra-compact power module HLK-PM01<p> <ul> <li>Meet UL, CE requirements</li> <li>Ultra-thin, ultra-small</li> <li>All voltage input (AC: 90 ~ 264V)</li> <li>Low ripple and low noise</li> <li>Output overload and short circuit protection</li> <li>High efficiency, high power density</li> <li>The product is designed to meet the requirements of EMC and Safety Test</li> <li>Low power consumption, environmental protection, no-load loss <0.1W</li> <li>100% load aging and testing</li>", Package="Package Analog Devices", Availability=Unavailable, MF=Hi-link, MP=hlk-pm01, Price=None, SnapEDA_Link=https://www.snapeda.com/parts/hlk-pm01/Hi-link/view-part/2875605/?ref=snap
L1: Code_IEC=1005, Code_JEITA=0402, LatestRevisionDate=29-May-2009, LatestRevisionNote="IPC-7351 Footprint Added.", PackageDescription="Chip Inductor", PackageReference=0402-A, Published=8-Jun-2000, Publisher="Altium Limited"

## Free pads (board coordinates)
  round 1 hole 1: 0(31.623,91.948) 0(31.623,92.329) 0(31.623,92.71) 0(31.623,93.218) 0(31.623,93.726) 0(31.623,94.107) 0(31.623,94.488) 0(31.623,94.996) 0(31.623,95.377) 0(31.623,95.758) 0(31.623,96.139) 0(31.623,96.647) 0(31.623,97.028) 0(31.623,97.409) 0(31.623,97.79) 0(31.623,98.298) 0(31.623,98.679) 0(31.623,99.06) 0(31.623,99.441) 0(31.623,99.949) 0(31.623,100.33) 0(31.623,100.711) 0(31.623,100.838) 0(32.131,100.838) 0(32.258,91.948) 0(32.639,91.948) 0(32.639,100.838) 0(33.02,91.948) 0(33.02,100.838) 0(33.401,100.838) 0(33.528,91.948) 0(33.782,100.838) 0(33.909,91.948) 0(33.909,91.948) 0(34.29,100.838) 0(34.29,100.838) 0(34.417,91.948) 0(34.671,100.838) 0(34.925,91.948) 0(35.179,100.838) 0(35.306,91.948) 0(35.56,100.838) 0(35.687,91.948) 0(35.941,100.838) 0(36.068,91.948) 0(36.576,91.948) 0(36.576,92.075) 0(36.576,92.456) 0(36.576,92.837) 0(36.576,93.345) 0(36.576,93.726) 0(36.576,94.107) 0(36.576,94.488) 0(36.576,94.996) 0(36.576,95.377) 0(36.576,95.758) 0(36.576,96.139) 0(36.576,96.647) 0(36.576,97.028) 0(36.576,97.409) 0(36.576,97.79) 0(36.576,98.298) 0(36.576,98.679) 0(36.576,99.06) 0(36.576,99.568) 0(36.576,100.076) 0(36.576,100.457) 0(36.576,100.838) 0(51.181,95.758) 0(51.181,95.758) 0(51.181,96.266) 0(51.181,96.647) 0(51.181,97.028) 0(51.181,97.409) 0(51.181,97.917) 0(51.181,98.298) 0(51.181,98.679) 0(51.181,99.06) 0(51.181,99.568) 0(51.181,99.949) 0(51.181,100.33) 0(51.181,100.584) 0(51.181,101.092) 0(51.181,101.473) 0(51.181,101.854) 0(51.181,102.235) 0(51.181,102.743) 0(51.181,103.124) 0(51.181,103.505) 0(51.181,104.013) 0(51.181,104.521) 0(51.181,104.902) 0(51.181,105.283) 0(51.181,105.664) 0(51.181,106.172) 0(51.181,106.553) 0(51.181,106.934) 0(51.181,107.061) 0(51.689,95.758) 0(51.689,107.061) 0(52.07,95.758) 0(52.07,107.061) 0(52.451,95.758) 0(52.451,107.061) 0(52.705,95.758) 0(52.832,107.061) 0(53.086,95.758) 0(53.213,95.758) 0(53.213,107.061) 0(53.34,107.061) 0(53.721,95.758) 0(53.848,107.061) 0(54.229,95.758) 0(54.229,107.061) 0(54.61,95.758) 0(54.61,107.061) 0(54.737,95.758) 0(54.737,107.061) 0(55.245,95.758) 0(55.245,107.061) 0(55.626,95.758) 0(55.753,107.061) 0(56.007,95.758) 0(56.134,107.061) 0(56.388,95.758) 0(56.769,95.758) 0(56.769,96.139) 0(56.769,96.52) 0(56.769,97.028) 0(56.769,97.409) 0(56.769,97.917) 0(56.769,98.298) 0(56.769,98.679) 0(56.769,99.06) 0(56.769,99.568) 0(56.769,99.949) 0(56.769,100.33) 0(56.769,100.711) 0(56.769,101.219) 0(56.769,101.6) 0(56.769,101.981) 0(56.769,102.362) 0(56.769,102.87) 0(56.769,103.251) 0(56.769,103.632) 0(56.769,104.013) 0(56.769,104.521) 0(56.769,104.902) 0(56.769,105.283) 0(56.769,105.791) 0(56.769,106.299) 0(56.769,106.68) 0(56.769,107.061) 0(68.199,95.758) 0(68.199,95.758) 0(68.199,96.266) 0(68.199,96.647) 0(68.199,97.028) 0(68.199,97.409) 0(68.199,97.917) 0(68.199,98.298) 0(68.199,98.679) 0(68.199,99.06) 0(68.199,99.568) 0(68.199,99.949) 0(68.199,100.33) 0(68.199,100.584) 0(68.199,101.092) 0(68.199,101.473) 0(68.199,101.854) 0(68.199,102.235) 0(68.199,102.743) 0(68.199,103.124) 0(68.199,103.505) 0(68.199,104.013) 0(68.199,104.521) 0(68.199,104.902) 0(68.199,105.283) 0(68.199,105.664) 0(68.199,106.172) 0(68.199,106.553) 0(68.199,106.934) 0(68.199,107.061) 0(68.707,95.758) 0(68.707,107.061) 0(69.088,95.758) 0(69.088,107.061) 0(69.469,95.758) 0(69.469,107.061) 0(69.85,95.758) 0(69.977,107.061) 0(70.358,95.758) 0(70.485,107.061) 0(70.739,95.758) 0(70.866,107.061) 0(71.12,95.758) 0(71.247,107.061) 0(71.374,107.061) 0(71.628,95.758) 0(71.882,107.061) 0(72.136,95.758) 0(72.263,107.061) 0(72.517,95.758) 0(72.644,107.061) 0(72.898,95.758) 0(73.025,107.061) 0(73.279,95.758) 0(73.533,107.061) 0(73.787,95.758) 0(73.914,107.061) 0(74.168,95.758) 0(74.295,107.061) 0(74.549,95.758) 0(74.93,95.758) 0(74.93,96.139) 0(74.93,96.52) 0(74.93,97.028) 0(74.93,97.409) 0(74.93,97.917) 0(74.93,98.298) 0(74.93,98.679) 0(74.93,99.06) 0(74.93,99.568) 0(74.93,99.949) 0(74.93,100.33) 0(74.93,100.711) 0(74.93,101.219) 0(74.93,101.6) 0(74.93,101.981) 0(74.93,102.362) 0(74.93,102.87) 0(74.93,103.251) 0(74.93,103.632) 0(74.93,104.013) 0(74.93,104.521) 0(74.93,104.902) 0(74.93,105.283) 0(74.93,105.791) 0(74.93,106.299) 0(74.93,106.68) 0(74.93,107.061) 0(85.852,29.972) 0(85.852,29.972) 0(85.852,30.48) 0(85.852,30.861) 0(85.852,31.242) 0(85.852,31.623) 0(85.852,32.131) 0(85.852,32.512) 0(85.852,32.893) 0(85.852,33.274) 0(85.852,33.782) 0(85.852,34.163) 0(85.852,34.544) 0(85.852,34.798) 0(85.852,35.306) 0(85.852,35.687) 0(85.852,36.068) 0(85.852,36.449) 0(85.852,36.957) 0(85.852,37.338) 0(85.852,37.719) 0(85.852,38.227) 0(85.852,38.735) 0(85.852,39.116) 0(85.852,39.497) 0(85.852,39.878) 0(85.852,40.386) 0(85.852,40.767) 0(85.852,41.148) 0(85.852,41.275) 0(86.106,95.758) 0(86.106,95.758) 0(86.106,96.266) 0(86.106,96.647) 0(86.106,97.028) 0(86.106,97.409) 0(86.106,97.917) 0(86.106,98.298) 0(86.106,98.679) 0(86.106,99.06) 0(86.106,99.568) 0(86.106,99.949) 0(86.106,100.33) 0(86.106,100.584) 0(86.106,101.092) 0(86.106,101.473) 0(86.106,101.854) 0(86.106,102.235) 0(86.106,102.743) 0(86.106,103.124) 0(86.106,103.505) 0(86.106,104.013) 0(86.106,104.521) 0(86.106,104.902) 0(86.106,105.283) 0(86.106,105.664) 0(86.106,106.172) 0(86.106,106.553) 0(86.106,106.934) 0(86.106,107.061) 0(86.36,29.972) 0(86.36,41.275) 0(86.614,95.758) 0(86.614,107.061) 0(86.741,29.972) 0(86.741,41.275) 0(86.995,95.758) 0(86.995,107.061) 0(87.122,29.972) 0(87.122,41.275) 0(87.376,95.758) 0(87.376,107.061) 0(87.503,29.972) 0(87.63,41.275) 0(87.757,95.758) 0(87.884,107.061) 0(88.011,29.972) 0(88.138,41.275) 0(88.265,95.758) 0(88.392,29.972) 0(88.392,107.061) 0(88.519,41.275) 0(88.646,95.758) 0(88.773,29.972) 0(88.773,107.061) 0(88.9,41.275) 0(89.027,41.275) 0(89.027,95.758) 0(89.154,107.061) 0(89.281,29.972) 0(89.281,107.061) 0(89.535,41.275) 0(89.535,95.758) 0(89.789,29.972) 0(89.789,107.061) 0(89.916,41.275) 0(90.043,95.758) 0(90.17,29.972) 0(90.17,107.061) 0(90.297,41.275) 0(90.424,95.758) 0(90.551,29.972) 0(90.551,107.061) 0(90.678,41.275) 0(90.805,95.758) 0(90.932,29.972) 0(90.932,107.061) 0(91.186,41.275) 0(91.186,95.758) 0(91.44,29.972) 0(91.44,107.061) 0(91.567,41.275) 0(91.694,95.758) 0(91.821,29.972) 0(91.821,107.061) 0(91.948,41.275) 0(92.075,95.758) 0(92.202,29.972) 0(92.202,107.061) 0(92.456,95.758) 0(92.583,29.972) 0(92.583,30.353) 0(92.583,30.734) 0(92.583,31.242) 0(92.583,31.623) 0(92.583,32.131) 0(92.583,32.512) 0(92.583,32.893) 0(92.583,33.274) 0(92.583,33.782) 0(92.583,34.163) 0(92.583,34.544) 0(92.583,34.925) 0(92.583,35.433) 0(92.583,35.814) 0(92.583,36.195) 0(92.583,36.576) 0(92.583,37.084) 0(92.583,37.465) 0(92.583,37.846) 0(92.583,38.227) 0(92.583,38.735) 0(92.583,39.116) 0(92.583,39.497) 0(92.583,40.005) 0(92.583,40.513) 0(92.583,40.894) 0(92.583,41.275) 0(92.837,95.758) 0(92.837,96.139) 0(92.837,96.52) 0(92.837,97.028) 0(92.837,97.409) 0(92.837,97.917) 0(92.837,98.298) 0(92.837,98.679) 0(92.837,99.06) 0(92.837,99.568) 0(92.837,99.949) 0(92.837,100.33) 0(92.837,100.711) 0(92.837,101.219) 0(92.837,101.6) 0(92.837,101.981) 0(92.837,102.362) 0(92.837,102.87) 0(92.837,103.251) 0(92.837,103.632) 0(92.837,104.013) 0(92.837,104.521) 0(92.837,104.902) 0(92.837,105.283) 0(92.837,105.791) 0(92.837,106.299) 0(92.837,106.68) 0(92.837,107.061) 0(104.013,29.972) 0(104.013,29.972) 0(104.013,30.48) 0(104.013,30.861) 0(104.013,31.242) 0(104.013,31.623) 0(104.013,32.131) 0(104.013,32.512) 0(104.013,32.893) 0(104.013,33.274) 0(104.013,33.782) 0(104.013,34.163) 0(104.013,34.544) 0(104.013,34.798) 0(104.013,35.306) 0(104.013,35.687) 0(104.013,36.068) 0(104.013,36.449) 0(104.013,36.957) 0(104.013,37.338) 0(104.013,37.719) 0(104.013,38.227) 0(104.013,38.735) 0(104.013,39.116) 0(104.013,39.497) 0(104.013,39.878) 0(104.013,40.386) 0(104.013,40.767) 0(104.013,41.148) 0(104.013,41.275) 0(104.267,95.758) 0(104.267,95.758) 0(104.267,96.266) 0(104.267,96.647) 0(104.267,97.028) 0(104.267,97.409) 0(104.267,97.917) 0(104.267,98.298) 0(104.267,98.679) 0(104.267,99.06) 0(104.267,99.568) 0(104.267,99.949) 0(104.267,100.33) 0(104.267,100.584) 0(104.267,101.092) 0(104.267,101.473) 0(104.267,101.854) 0(104.267,102.235) 0(104.267,102.743) 0(104.267,103.124) 0(104.267,103.505) 0(104.267,104.013) 0(104.267,104.521) 0(104.267,104.902) 0(104.267,105.283) 0(104.267,105.664) 0(104.267,106.172) 0(104.267,106.553) 0(104.267,106.934) 0(104.267,107.061) 0(104.521,29.972) 0(104.521,41.275) 0(104.775,95.758) 0(104.775,107.061) 0(104.902,29.972) 0(104.902,41.275) 0(105.156,95.758) 0(105.156,107.061) 0(105.283,29.972) 0(105.283,41.275) 0(105.537,95.758) 0(105.537,107.061) 0(105.664,29.972) 0(105.791,41.275) 0(105.918,95.758) 0(106.045,107.061) 0(106.172,29.972) 0(106.299,41.275) 0(106.426,95.758) 0(106.553,29.972) 0(106.553,107.061) 0(106.68,41.275) 0(106.807,95.758) 0(106.934,29.972) 0(106.934,107.061) 0(107.061,41.275) 0(107.188,41.275) 0(107.188,95.758) 0(107.315,107.061) 0(107.442,29.972) 0(107.442,107.061) 0(107.696,41.275) 0(107.696,95.758) 0(107.95,29.972) 0(107.95,107.061) 0(108.077,41.275) 0(108.204,95.758) 0(108.331,29.972) 0(108.331,107.061) 0(108.458,41.275) 0(108.585,95.758) 0(108.712,29.972) 0(108.712,107.061) 0(108.839,41.275) 0(108.966,95.758) 0(109.093,29.972) 0(109.093,107.061) 0(109.347,41.275) 0(109.347,95.758) 0(109.601,29.972) 0(109.601,107.061) 0(109.728,41.275) 0(109.855,95.758) 0(109.982,29.972) 0(109.982,107.061) 0(110.109,41.275) 0(110.236,95.758) 0(110.363,29.972) 0(110.363,107.061) 0(110.617,95.758) 0(110.744,29.972) 0(110.744,30.353) 0(110.744,30.734) 0(110.744,31.242) 0(110.744,31.623) 0(110.744,32.131) 0(110.744,32.512) 0(110.744,32.893) 0(110.744,33.274) 0(110.744,33.782) 0(110.744,34.163) 0(110.744,34.544) 0(110.744,34.925) 0(110.744,35.433) 0(110.744,35.814) 0(110.744,36.195) 0(110.744,36.576) 0(110.744,37.084) 0(110.744,37.465) 0(110.744,37.846) 0(110.744,38.227) 0(110.744,38.735) 0(110.744,39.116) 0(110.744,39.497) 0(110.744,40.005) 0(110.744,40.513) 0(110.744,40.894) 0(110.744,41.275) 0(110.998,95.758) 0(110.998,96.139) 0(110.998,96.52) 0(110.998,97.028) 0(110.998,97.409) 0(110.998,97.917) 0(110.998,98.298) 0(110.998,98.679) 0(110.998,99.06) 0(110.998,99.568) 0(110.998,99.949) 0(110.998,100.33) 0(110.998,100.711) 0(110.998,101.219) 0(110.998,101.6) 0(110.998,101.981) 0(110.998,102.362) 0(110.998,102.87) 0(110.998,103.251) 0(110.998,103.632) 0(110.998,104.013) 0(110.998,104.521) 0(110.998,104.902) 0(110.998,105.283) 0(110.998,105.791) 0(110.998,106.299) 0(110.998,106.68) 0(110.998,107.061) 0(121.92,29.972) 0(121.92,29.972) 0(121.92,30.48) 0(121.92,30.861) 0(121.92,31.242) 0(121.92,31.623) 0(121.92,32.131) 0(121.92,32.512) 0(121.92,32.893) 0(121.92,33.274) 0(121.92,33.782) 0(121.92,34.163) 0(121.92,34.544) 0(121.92,34.798) 0(121.92,35.306) 0(121.92,35.687) 0(121.92,36.068) 0(121.92,36.449) 0(121.92,36.957) 0(121.92,37.338) 0(121.92,37.719) 0(121.92,38.227) 0(121.92,38.735) 0(121.92,39.116) 0(121.92,39.497) 0(121.92,39.878) 0(121.92,40.386) 0(121.92,40.767) 0(121.92,41.148) 0(121.92,41.275) 0(122.174,95.758) 0(122.174,95.758) 0(122.174,96.266) 0(122.174,96.647) 0(122.174,97.028) 0(122.174,97.409) 0(122.174,97.917) 0(122.174,98.298) 0(122.174,98.679) 0(122.174,99.06) 0(122.174,99.568) 0(122.174,99.949) 0(122.174,100.33) 0(122.174,100.584) 0(122.174,101.092) 0(122.174,101.473) 0(122.174,101.854) 0(122.174,102.235) 0(122.174,102.743) 0(122.174,103.124) 0(122.174,103.505) 0(122.174,104.013) 0(122.174,104.521) 0(122.174,104.902) 0(122.174,105.283) 0(122.174,105.664) 0(122.174,106.172) 0(122.174,106.553) 0(122.174,106.934) 0(122.174,107.061) 0(122.428,29.972) 0(122.428,41.275) 0(122.682,95.758) 0(122.682,107.061) 0(122.809,29.972) 0(122.809,41.275) 0(123.063,95.758) 0(123.063,107.061) 0(123.19,29.972) 0(123.19,41.275) 0(123.444,95.758) 0(123.444,107.061) 0(123.571,29.972) 0(123.698,41.275) 0(123.825,95.758) 0(123.952,107.061) 0(124.079,29.972) 0(124.206,41.275) 0(124.333,95.758) 0(124.46,29.972) 0(124.46,107.061) 0(124.587,41.275) 0(124.714,95.758) 0(124.841,29.972) 0(124.841,107.061) 0(124.968,41.275) 0(125.095,41.275) 0(125.095,95.758) 0(125.222,107.061) 0(125.349,29.972) 0(125.349,107.061) 0(125.603,41.275) 0(125.603,95.758) 0(125.857,29.972) 0(125.857,107.061) 0(125.984,41.275) 0(126.111,95.758) 0(126.238,29.972) 0(126.238,107.061) 0(126.365,41.275) 0(126.492,95.758) 0(126.619,29.972) 0(126.619,107.061) 0(126.746,41.275) 0(126.873,95.758) 0(127,29.972) 0(127,107.061) 0(127.254,41.275) 0(127.254,95.758) 0(127.508,29.972) 0(127.508,107.061) 0(127.635,41.275) 0(127.762,95.758) 0(127.889,29.972) 0(127.889,107.061) 0(128.016,41.275) 0(128.143,95.758) 0(128.27,29.972) 0(128.27,107.061) 0(128.524,95.758) 0(128.651,29.972) 0(128.651,30.353) 0(128.651,30.734) 0(128.651,31.242) 0(128.651,31.623) 0(128.651,32.131) 0(128.651,32.512) 0(128.651,32.893) 0(128.651,33.274) 0(128.651,33.782) 0(128.651,34.163) 0(128.651,34.544) 0(128.651,34.925) 0(128.651,35.433) 0(128.651,35.814) 0(128.651,36.195) 0(128.651,36.576) 0(128.651,37.084) 0(128.651,37.465) 0(128.651,37.846) 0(128.651,38.227) 0(128.651,38.735) 0(128.651,39.116) 0(128.651,39.497) 0(128.651,40.005) 0(128.651,40.513) 0(128.651,40.894) 0(128.651,41.275) 0(128.905,95.758) 0(128.905,96.139) 0(128.905,96.52) 0(128.905,97.028) 0(128.905,97.409) 0(128.905,97.917) 0(128.905,98.298) 0(128.905,98.679) 0(128.905,99.06) 0(128.905,99.568) 0(128.905,99.949) 0(128.905,100.33) 0(128.905,100.711) 0(128.905,101.219) 0(128.905,101.6) 0(128.905,101.981) 0(128.905,102.362) 0(128.905,102.87) 0(128.905,103.251) 0(128.905,103.632) 0(128.905,104.013) 0(128.905,104.521) 0(128.905,104.902) 0(128.905,105.283) 0(128.905,105.791) 0(128.905,106.299) 0(128.905,106.68) 0(128.905,107.061) 0(140.081,95.758) 0(140.081,95.758) 0(140.081,96.266) 0(140.081,96.647) 0(140.081,97.028) 0(140.081,97.409) 0(140.081,97.917) 0(140.081,98.298) 0(140.081,98.679) 0(140.081,99.06) 0(140.081,99.568) 0(140.081,99.949) 0(140.081,100.33) 0(140.081,100.584) 0(140.081,101.092) 0(140.081,101.473) 0(140.081,101.854) 0(140.081,102.235) 0(140.081,102.743) 0(140.081,103.124) 0(140.081,103.505) 0(140.081,104.013) 0(140.081,104.521) 0(140.081,104.902) 0(140.081,105.283) 0(140.081,105.664) 0(140.081,106.172) 0(140.081,106.553) 0(140.081,106.934) 0(140.081,107.061) 0(140.335,29.972) 0(140.335,29.972) 0(140.335,30.48) 0(140.335,30.861) 0(140.335,31.242) 0(140.335,31.623) 0(140.335,32.131) 0(140.335,32.512) 0(140.335,32.893) 0(140.335,33.274) 0(140.335,33.782) 0(140.335,34.163) 0(140.335,34.544) 0(140.335,34.798) 0(140.335,35.306) 0(140.335,35.687) 0(140.335,36.068) 0(140.335,36.449) 0(140.335,36.957) 0(140.335,37.338) 0(140.335,37.719) 0(140.335,38.227) 0(140.335,38.735) 0(140.335,39.116) 0(140.335,39.497) 0(140.335,39.878) 0(140.335,40.386) 0(140.335,40.767) 0(140.335,41.148) 0(140.335,41.275) 0(140.589,95.758) 0(140.589,107.061) 0(140.843,29.972) 0(140.843,41.275) 0(140.97,95.758) 0(140.97,107.061) 0(141.224,29.972) 0(141.224,41.275) 0(141.351,95.758) 0(141.351,107.061) 0(141.605,29.972) 0(141.605,41.275) 0(141.732,95.758) 0(141.859,107.061) 0(141.986,29.972) 0(142.113,41.275) 0(142.24,95.758) 0(142.367,107.061) 0(142.494,29.972) 0(142.621,41.275) 0(142.621,95.758) 0(142.748,107.061) 0(142.875,29.972) 0(143.002,41.275) 0(143.002,95.758) 0(143.129,107.061) 0(143.256,29.972) 0(143.256,107.061) 0(143.383,41.275) 0(143.51,41.275) 0(143.51,95.758) 0(143.764,29.972) 0(143.764,107.061) 0(144.018,41.275) 0(144.018,95.758) 0(144.145,107.061) 0(144.272,29.972) 0(144.399,41.275) 0(144.399,95.758) 0(144.526,107.061) 0(144.653,29.972) 0(144.78,41.275) 0(144.78,95.758) 0(144.907,107.061) 0(145.034,29.972) 0(145.161,41.275) 0(145.161,95.758) 0(145.415,29.972) 0(145.415,107.061) 0(145.669,41.275) 0(145.669,95.758) 0(145.796,107.061) 0(145.923,29.972) 0(146.05,41.275) 0(146.05,95.758) 0(146.177,107.061) 0(146.304,29.972) 0(146.431,41.275) 0(146.431,95.758) 0(146.685,29.972) 0(146.812,95.758) 0(146.812,96.139) 0(146.812,96.52) 0(146.812,97.028) 0(146.812,97.409) 0(146.812,97.917) 0(146.812,98.298) 0(146.812,98.679) 0(146.812,99.06) 0(146.812,99.568) 0(146.812,99.949) 0(146.812,100.33) 0(146.812,100.711) 0(146.812,101.219) 0(146.812,101.6) 0(146.812,101.981) 0(146.812,102.362) 0(146.812,102.87) 0(146.812,103.251) 0(146.812,103.632) 0(146.812,104.013) 0(146.812,104.521) 0(146.812,104.902) 0(146.812,105.283) 0(146.812,105.791) 0(146.812,106.299) 0(146.812,106.68) 0(146.812,107.061) 0(147.066,29.972) 0(147.066,30.353) 0(147.066,30.734) 0(147.066,31.242) 0(147.066,31.623) 0(147.066,32.131) 0(147.066,32.512) 0(147.066,32.893) 0(147.066,33.274) 0(147.066,33.782) 0(147.066,34.163) 0(147.066,34.544) 0(147.066,34.925) 0(147.066,35.433) 0(147.066,35.814) 0(147.066,36.195) 0(147.066,36.576) 0(147.066,37.084) 0(147.066,37.465) 0(147.066,37.846) 0(147.066,38.227) 0(147.066,38.735) 0(147.066,39.116) 0(147.066,39.497) 0(147.066,40.005) 0(147.066,40.513) 0(147.066,40.894) 0(147.066,41.275)

## Via types
v1: diameter 0.8, hole 0.4, Top Layer to Bottom Layer, 115 vias
v2: diameter 1.27, hole 0.711, Top Layer to Bottom Layer, 15 vias
v3: diameter 1, hole 0.5, Top Layer to Bottom Layer, 6 vias

## Nets (pads, with @x,y where several pads share a name; then routed paths per layer and width w, separated by ;. In a path a pad name is that pad's centre, name@x,y a point inside that pad or via, vN(x,y) a via of type N, cw(c..) or ccw(c..) an arc to the next point about the centre after c; other vN are vias at no path point)
2_13: P1.10 R65.2 | length 13.9
  Top Layer w0.5: R65.2@61.783,33.528 62.164,33.909 v1(63.119,33.909)
  Bottom Layer w0.5: v1(63.119,33.909) 63.119,25.781 64.008,24.892 P1.10@67.065,24.892
3V3: C43.2 C44.1 C58.2 J1.18 R62.2 U6.8 U9.3 | length 290.1
  Top Layer w0.5: C44.1@32.573,50.546 32.573,50.446 33.47,49.549 33.47,48.133 U9.3@33.47,45.607 33.512,45.565 v1(36.957,45.565) 36.957,31.623 36.068,30.734 36.068,19.558 38.735,16.891 72.009,16.891 ; U6.8@49.263,73.279 50.063,73.279 50.833,74.049 ; C58.2@51.882,74.549 51.882,74.449 51.482,74.049 50.833,74.049 ; v1(55.753,46.228) 55.753,54.864 58.928,58.039 58.928,75.184 57.912,76.2 51.308,76.2 50.833,75.725 50.833,74.049 ; R62.2@80.701,28.829 80.552,28.681 80.552,27.622 79.981,27.051 73.025,27.051 72.009,26.035 72.009,16.891 ; J1.18@164.084,59.944 165.997,59.944 166.886,59.055 166.886,53.221 166.878,53.213 166.878,43.23 164.661,41.013 152.519,41.013 149.733,38.227 149.733,28.956 148.59,27.813 145.288,27.813 144.272,26.797 144.272,18.161 143.002,16.891 72.009,16.891
  Bottom Layer w0.5: v1(36.957,45.565) 37.62,46.228 v1(55.753,46.228)